# Altium PCB AlarmClock.PcbDoc
Units mil, origin at the board's own origin, x right, y up, seen from the top; angles counter-clockwise.
Board outline 5720 x 4170 mil, 4 copper layers (Top Layer, GND, +3V3, Bottom Layer), stack 23.756 mil thick; 55 components, 37 nets, 213 pads, 30 vias.
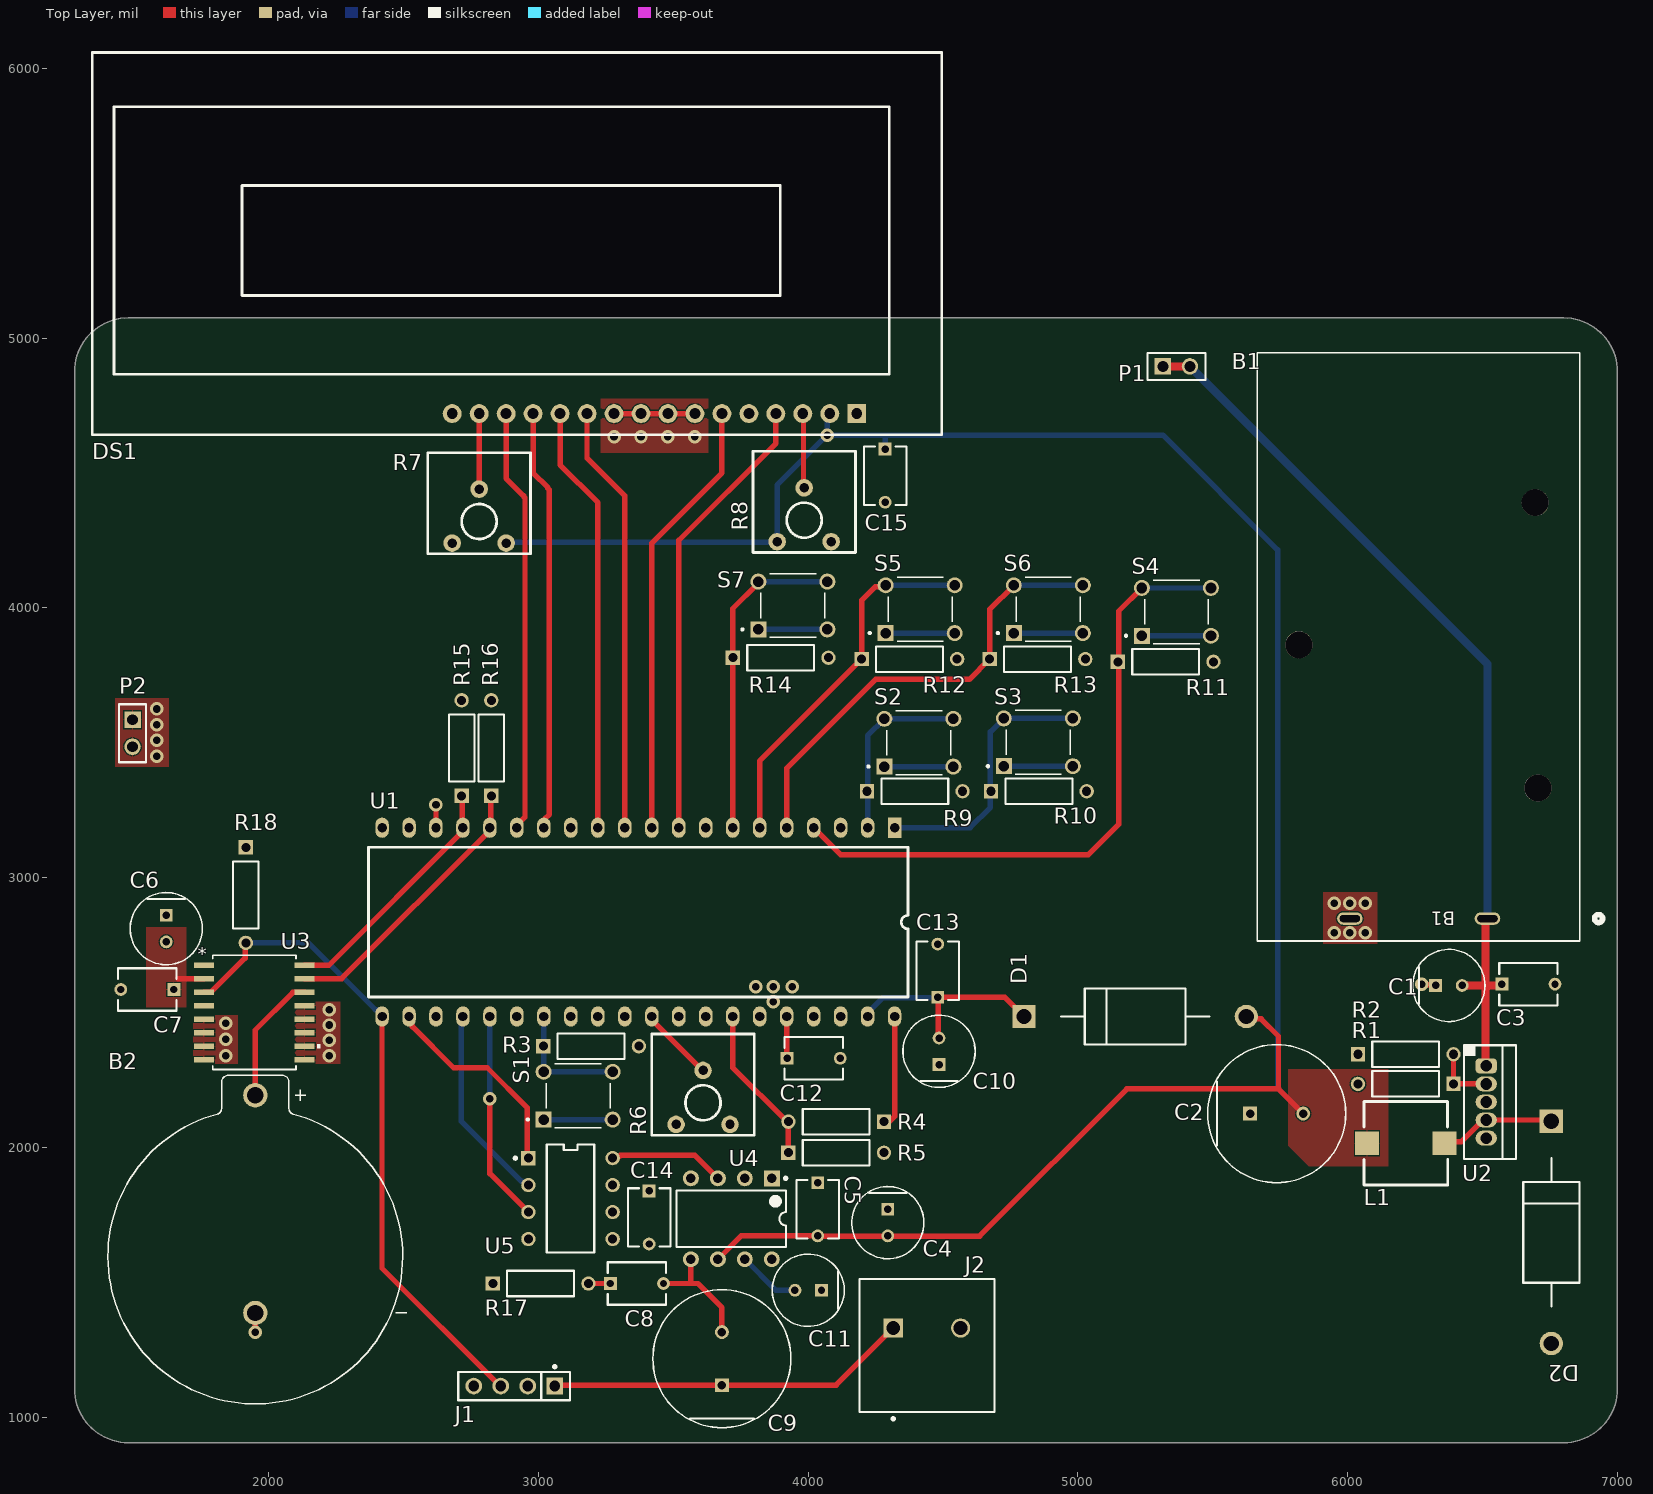
[diagram p0: Top Layer view]
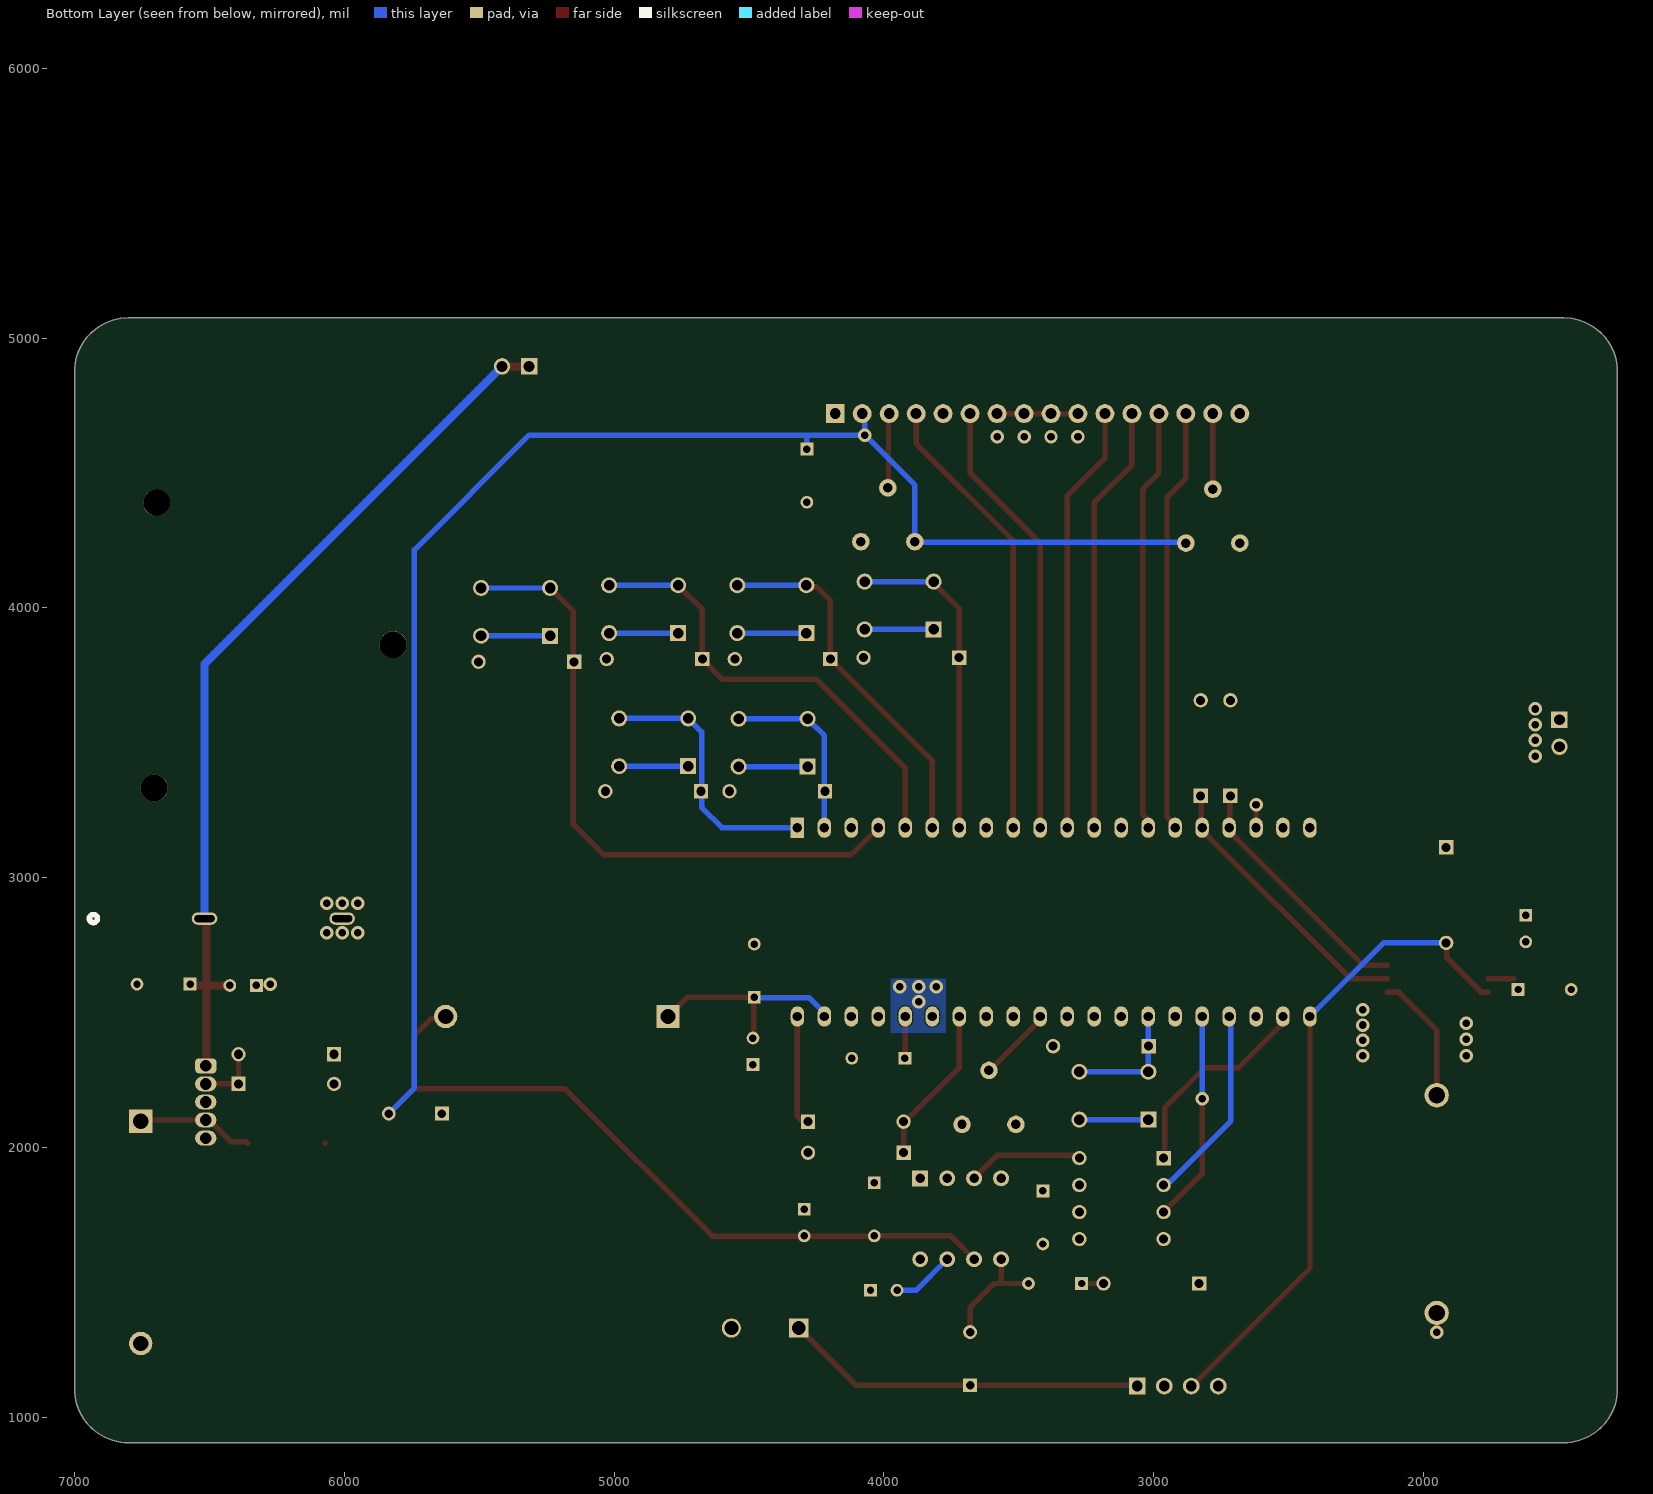
[diagram p1: Bottom Layer view, seen from below]
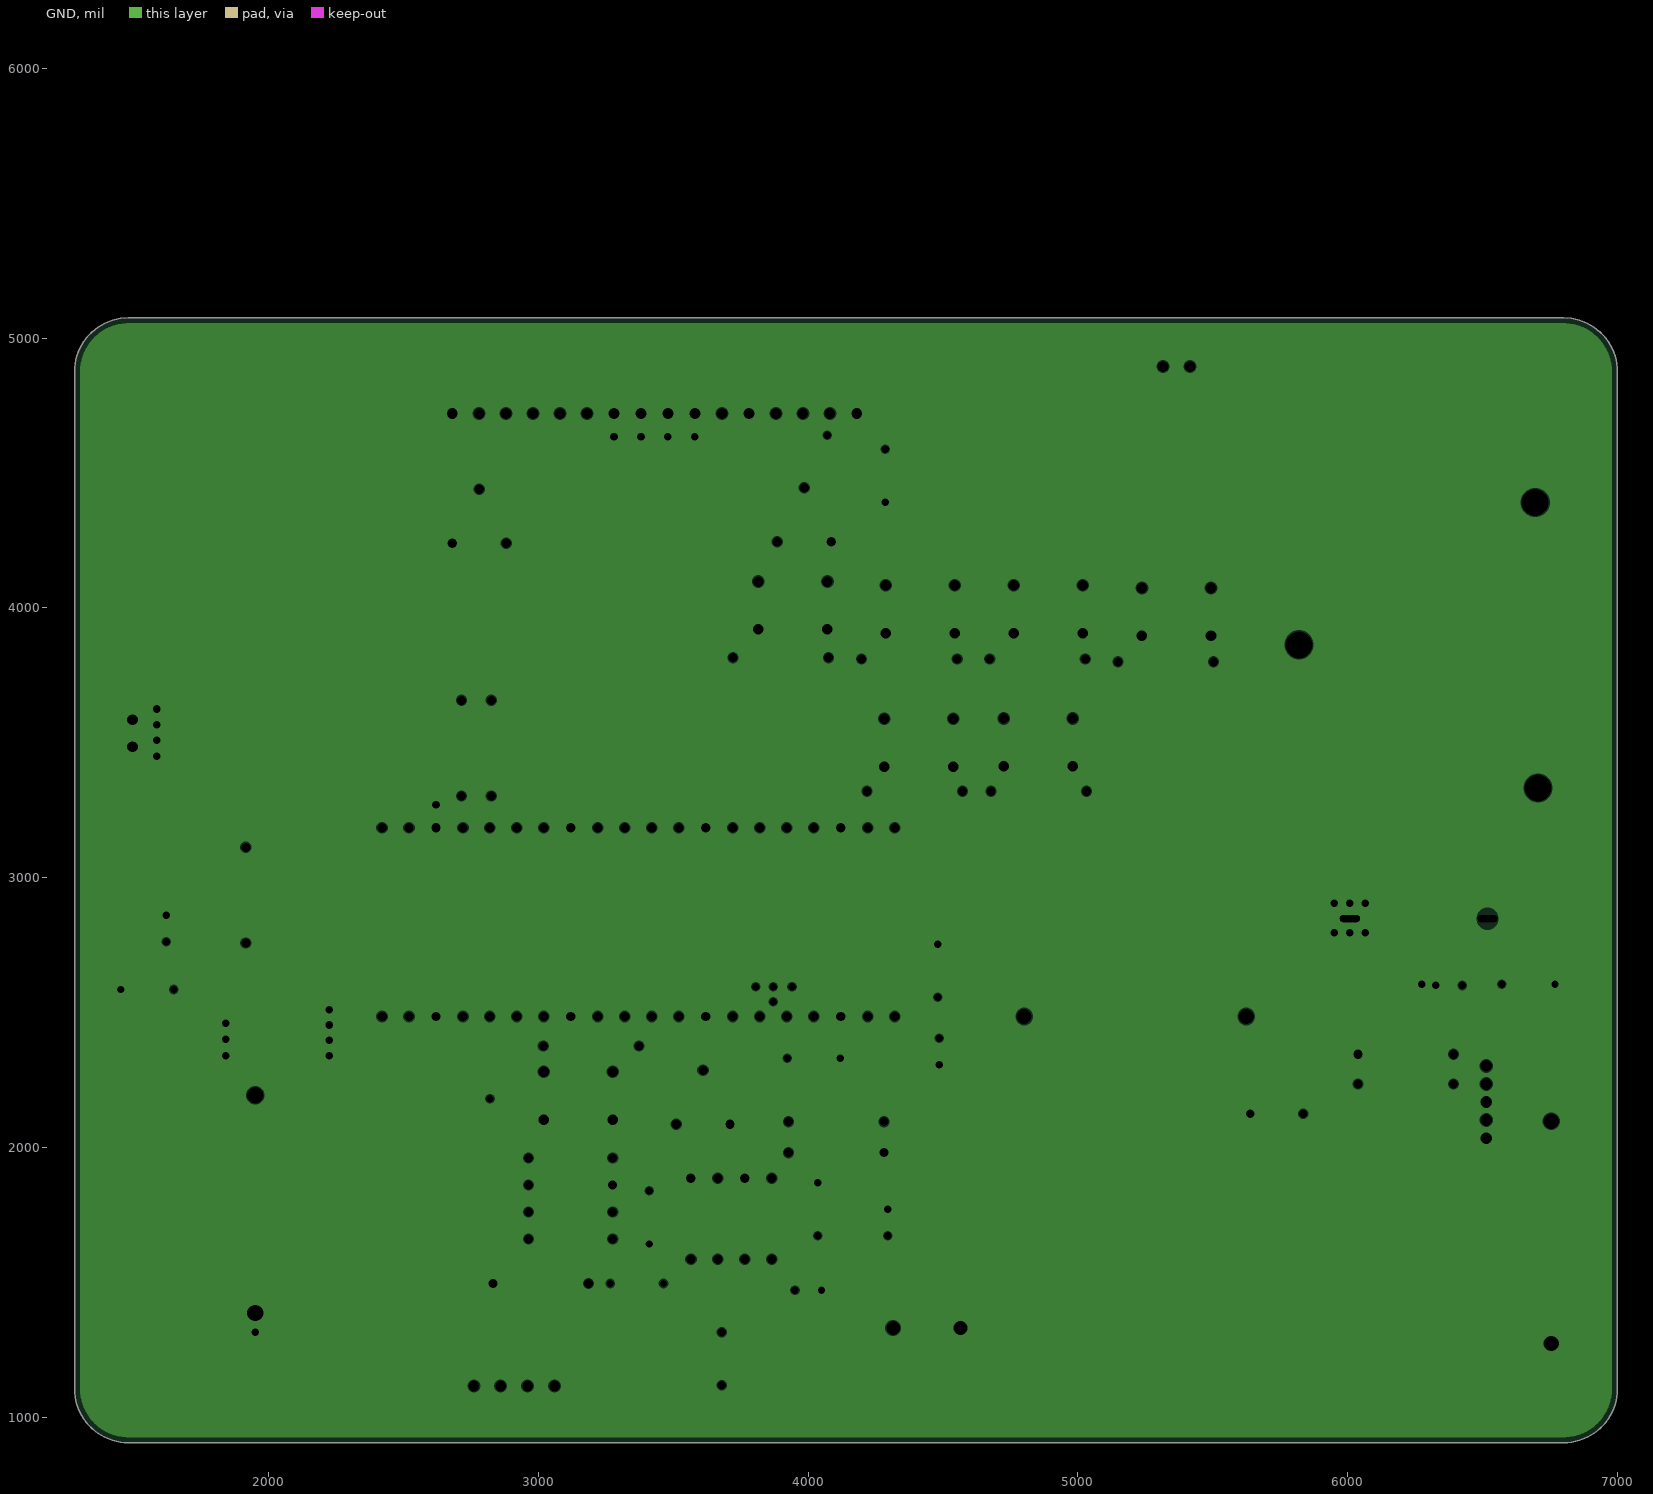
[diagram p2: GND, clearances drawn from the general rule]
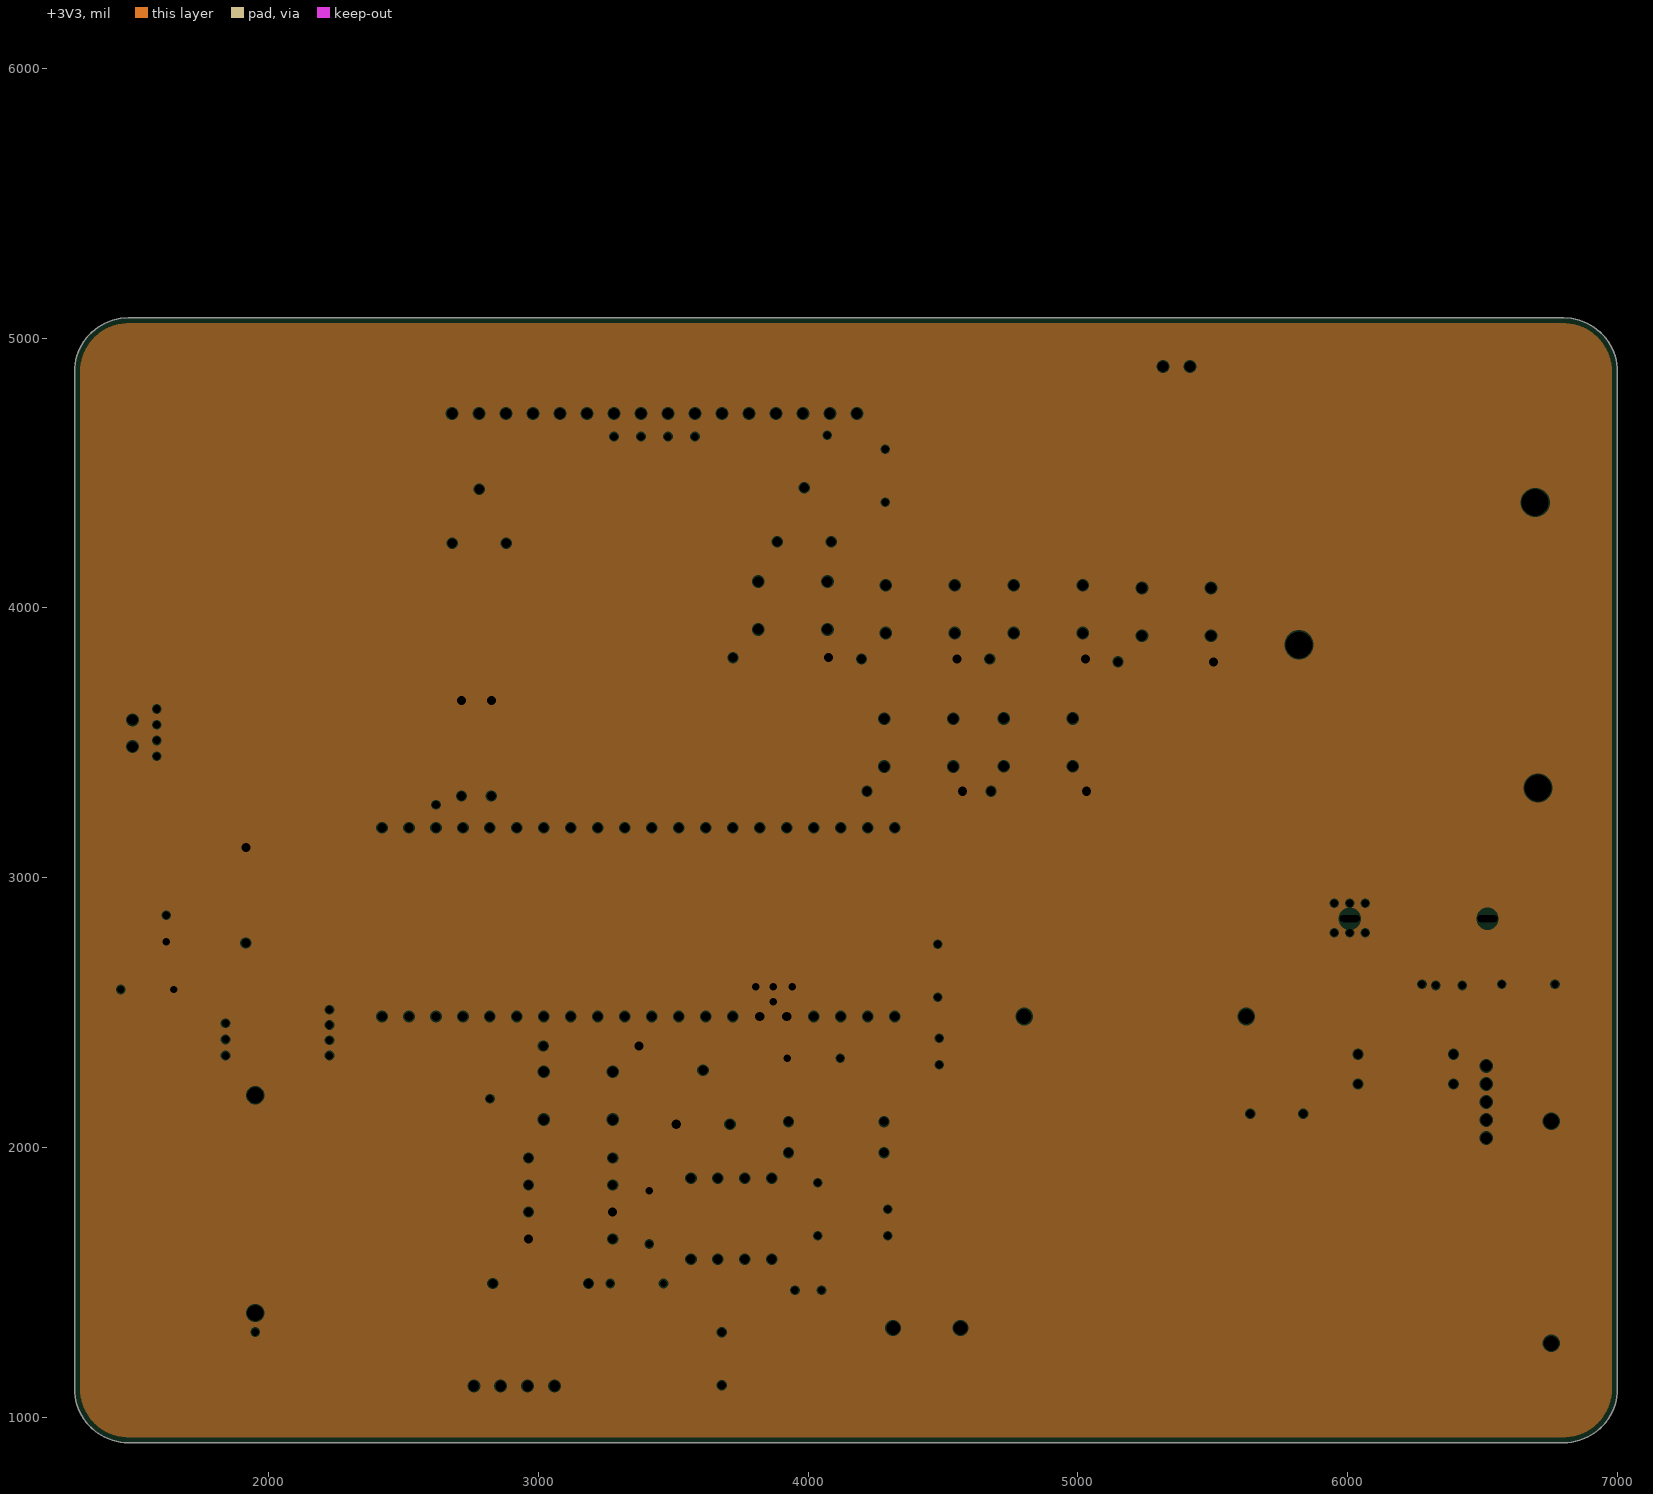
[diagram p3: +3V3, clearances drawn from the general rule]
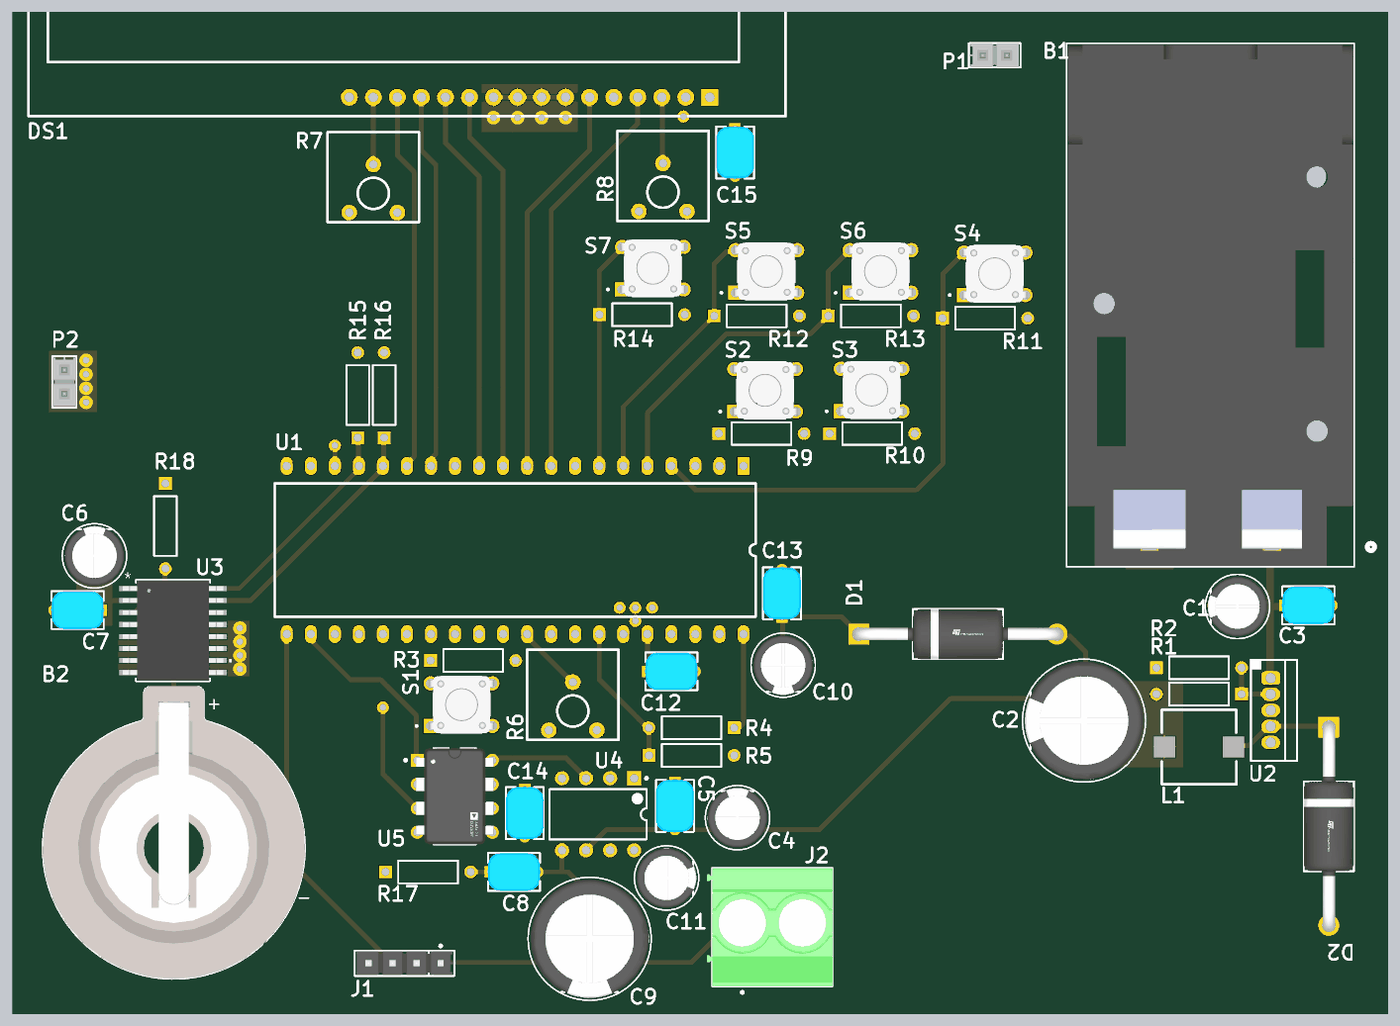
[diagram p4: 3D render of the assembled board from above, using the file's embedded part models]

## Layer stack, top to bottom
Top Solder: solder mask 0.4, Solder Resist, Dk 3.5
Top Layer: signal copper 1.4
Dielectric 2: prepreg 2.8, PP-006, Dk 4.1
GND: plane copper 1.378, net GND
Dielectric 1: dielectric 12.6, FR-4, Dk 4.8
+3V3: plane copper 1.378, net +3V3
Dielectric 3: prepreg 2.8, PP-006, Dk 4.1
Bottom Layer: signal copper 1.4
Bottom Solder: solder mask 0.4, Solder Resist, Dk 3.5

## Board outline
1280,1105 ccw(c1480,1105) 1480,905 6600,905 6800,905 ccw(c6800,1105) 7000,1105 7000,4875 ccw(c6800,4875) 6800,5075 1480,5075 ccw(c1480,4875) 1280,4875

## Design rules (kind name [scope] priority, off if disabled: settings)
BoardOutlineClearance [All] p1: gap=19.68 ignorepadtopadclearanceinfootprint=FALSE
Clearance [All] p1: gap=4 ignorepadtopadclearanceinfootprint=FALSE except(5: Arc-Via Track-Via SMDPad-Via THPad-Via Via-Via Via-Fill Via-Poly Via-Region Via-Text; 9.84: Arc-Hole Track-Hole SMDPad-Hole THPad-Hole Via-Hole Fill-Hole Poly-Hole Region-Hole Text-Hole)
ComponentClearance [All] p1: gap=4 collisioncheckmode=3 verticalgap=4 showdistances=TRUE
DiffPairsRouting [All] p1: maxlimit=4 minlimit=4 mostfreqgap=4 toplayer_minwidth=4 toplayer_maxwidth=71497.94 toplayer_prefwidth=4 bottomlayer_minwidth=4 bottomlayer_maxwidth=71497.94 bottomlayer_prefwidth=4 maxuncoupledlength=500
Height [All] p1: minheight=0 maxheight=71497.94 prefheight=500
HoleSize [All] p1: absolutevalues=TRUE maxlimit=248.03 minlimit=7.87 maxpercent=80.000 minpercent=20.000
HoleToHoleClearance [All] p1: gap=9.84 allowstackedmicrovias=FALSE
MinimumAnnularRing [All] p1: minimumring=3
MinimumSolderMaskSliver [All] p1: minsoldermaskwidth=0
PlaneClearance [All] p1: clearance=4
PlaneConnect PlaneConnectPowerPads [InPadClass('PowerPads')] p1: planeconnectstyle=Direct reliefexpansion=20 reliefentries=4 reliefconductorwidth=10 reliefairgap=10
PlaneConnect [All] p2: pad.planeconnectstyle=Relief pad.reliefexpansion=11.81 pad.reliefentries=4 pad.reliefconductorwidth=4 pad.reliefairgap=4 via.planeconnectstyle=Direct via.reliefexpansion=11.81 via.reliefentries=4 via.reliefconductorwidth=5 via.reliefairgap=5
PolygonConnect PolygonConnectPowerPads [All vs (InPadClass('PowerPads'))] p1: connectstyle=Direct reliefconductorwidth=10 reliefentries=4 polygonreliefangle="90 Angle" airgapwidth=10
PolygonConnect [All] p2: thpad.connectstyle=Relief thpad.reliefconductorwidth=4 thpad.reliefentries=4 thpad.polygonreliefangle="90 Angle" thpad.airgapwidth=4 smdpad.connectstyle=Relief smdpad.reliefconductorwidth=4 smdpad.reliefentries=4 smdpad.polygonreliefangle="90 Angle" smdpad.airgapwidth=4 via.connectstyle=Direct via.reliefconductorwidth=5 via.reliefentries=4 via.polygonreliefangle="90 Angle" via.airgapwidth=5
RoutingVias [All] p1: holewidth=20 width=40 viastyle="Through Hole" minholewidth=20 minwidth=40 maxholewidth=20 maxwidth=40
SilkToSilkClearance [All] p1: silktosilkclearance=0
SilkToSolderMaskClearance [IsPad] p1: minsilkscreentomaskgap=4 clearancetoexposedcopper=TRUE
SolderMaskExpansion [All] p1: expansion=2.95 istentingtop=FALSE
SupplyNets "Schematic Supply Nets_2" [InNet('+3V3')] p1: voltage=0.000
SupplyNets "Schematic Supply Nets_1" [InNet('+5V')] p2: voltage=0.000
SupplyNets "Schematic Supply Nets" [InNet('GND')] p3: voltage=0.000
Width +9V [InNet('+9V')] p1: maxlimit=30 minlimit=30 preferedwidth=30 minimp=50.000000 maximp=50.000000 favimp=50.000000
Width "Regulated Power" [InNetClass('Regulated Power')] p2: maxlimit=24 minlimit=15 preferedwidth=20 minimp=50.000000 maximp=50.000000 favimp=50.000000
Width Communications [InNetClass('Communications')] p3: maxlimit=12 minlimit=8 preferedwidth=10 minimp=50.000000 maximp=50.000000 favimp=50.000000
Width GND [All] p4: maxlimit=35 minlimit=15 preferedwidth=20 minimp=50.000000 maximp=50.000000 favimp=50.000000
Width [All] p5: maxlimit=40 minlimit=6 preferedwidth=10 minimp=50.000000 maximp=50.000000 favimp=50.000000
20 further rules are at their usual default settings.

## Classes and differential pairs
component class Peripherals: B2 C4 C5 C6 C7 C8 C9 C11 C14 C15 DS1 J2 R15 R16 R17 R18 U3 U4 U5
component class Core: B1 C1 C2 C3 C10 C12 C13 D1 D2 J1 L1 P1 P2 R1 R2 U1 U2
component class "Control & Inputs": R3 R4 R5 R6 R7 R8 R9 R10 R11 R12 R13 R14 S1 S2 S3 S4 S5 S6 S7

## Components (designator, comment, footprint, x,y, rotation, side; value= is the part's Value field where it differs from the comment)
B1 "BC9VPC" BC9VPC_MPD 6518,2848 r180 top
B2 "106" BAT_106 1950,1595 r180 top
C1 "EEUFM1E101B" FP-RAD-TH-D_6_3_0_5-L_11-MFG 6375,2600 r0 top
C2 "EEUFP1V102B" FP-RAD-TH-D_12_5_0_5-L_20-MFG 5736.57,2125 r0 top value=1000uF
C3 "RDED72W104K3K1H03B" FP-RDE3M1-MFG 6670,2605 r0 top
C4 "EEUFM1E101B" FP-RAD-TH-D_6_3_0_5-L_11-MFG 4295,1720.79 r270 top
C5 "RDED72W104K3K1H03B" FP-RDE3M1-MFG 4035,1770 r270 top
C6 "EEUFM1E101B" FP-RAD-TH-D_6_3_0_5-L_11-MFG 1620,2810.79 r270 top
C7 "RDED72W104K3K1H03B" FP-RDE3M1-MFG 1550,2585 r180 top
C8 "RDED72W104K3K1H03B" FP-RDE3M1-MFG 3365,1495 r0 top
C9 "EEUFS1K271B" FP-RAD-TH-D_12_5_0_5-L_20-MFG 3680,1216.57 r90 top
C10 "EEUFM1E101B" FP-RAD-TH-D_6_3_0_5-L_11-MFG 4485,2355.79 r90 top
C11 "EEUFM1E101B" FP-RAD-TH-D_6_3_0_5-L_11-MFG 4000,1470 r180 top
C12 "RDED72W104K3K1H03B" FP-RDE3M1-MFG 4020,2330 r0 top
C13 "RDED72W104K3K1H03B" FP-RDE3M1-MFG 4480,2655 r90 top
C14 "RDED72W104K3K1H03B" FP-RDE3M1-MFG 3410,1740 r270 top
C15 "RDED72W104K3K1H03B" FP-RDE3M1-MFG 4285,4490 r270 top
D1 "1N5822" FP-DO-201AD-MFG 5212.2,2485 r0 top
D2 "1N5822" FP-DO-201AD-MFG 6755,1685 r270 top
DS1 "LCD 44780" "OLED 16x2" 4180,4720 r180 top
J1 "TSW-104-23-T-S" FP-TSW-104-23-T-S-MFG 2910,1115 r180 top
J2 "1714955" PHOE-1714955_V 4440,1330 r0 top
L1 "Inductor" SPD73R-334M 6215,2015 r180 top value=330uH
P1 "TSW-102-26-T-S" SMTC-TSW-102-26-XX-S 5315,4895 r0 top
P2 "TSW-102-26-T-S" SMTC-TSW-102-26-XX-S 1495,3585 r270 top
R1 "MFR-25FBF52-1M" RESA60-630X240 6215,2235 r180 top
R2 "MFR-25FBF52-1M" RESA60-630X240 6215,2345 r0 top
R3 "MFR-25FBF52-1M" RESA60-630X240 3195,2375 r0 top
R4 "MFR-25FBF52-1M" RESA60-630X240 4103.66,2095 r180 top
R5 "MFR-25FBF52-1M" RESA60-630X240 4103.66,1980 r0 top
R6 "RPot_3" "POT OFFSET 200" 3510,2085 r0 top value=10K
R7 "RPot_3" "POT OFFSET 200" 2680,4240 r0 top value=10K
R8 "RPot_3" "POT OFFSET 200" 3885,4245 r0 top value=10K
R9 "MFR-25FBF52-1M" RESA60-630X240 4395,3320 r0 top
R10 "MFR-25FBF52-1M" RESA60-630X240 4855,3320 r0 top
R11 "MFR-25FBF52-1M" RESA60-630X240 5325,3800 r0 top
R12 "MFR-25FBF52-1M" RESA60-630X240 4375,3810 r0 top
R13 "MFR-25FBF52-1M" RESA60-630X240 4850,3810 r0 top
R14 "MFR-25FBF52-1M" RESA60-630X240 3897.83,3815 r0 top
R15 "MFR-25FBF52-1M" RESA60-630X240 2715,3480 r90 top
R16 "MFR-25FBF52-1M" RESA60-630X240 2825,3480 r90 top
R17 "MFR-25FBF52-1M" RESA60-630X240 3007.83,1495 r0 top
R18 "MFR-25FBF52-1M" RESA60-630X240 1915,2935 r270 top
S1 "TL1105AF160Q" SW_TL1105AF160Q 3147.05,2191.42 r0 top
S2 "TL1105AF160Q" SW_TL1105AF160Q 4410,3500 r0 top
S3 "TL1105AF160Q" SW_TL1105AF160Q 4852.95,3501.42 r0 top
S4 "TL1105AF160Q" SW_TL1105AF160Q 5365,3985 r0 top
S5 "TL1105AF160Q" SW_TL1105AF160Q 4415,3995 r0 top
S6 "TL1105AF160Q" SW_TL1105AF160Q 4890,3995 r0 top
S7 "TL1105AF160Q" SW_TL1105AF160Q 3942.95,4008.58 r0 top
U1 "Raspberry Pi Pico" "Raspberry Pi Pico" 4320,3185 r270 top
U2 "LM2576T-ADJ/NOPB" KC0005A 6513.5,2168 r0 top
U3 "DS3231SN#T&R" 21-0042B_16_MXM 1946.5,2500 r0 top
U4 "LM386N-1" DIP-8 3715,1735 r270 top
U5 "LTC1661IN8#PBF" FP-N-8-05-08-1510-MFG 3118.75,1810 r0 top

## Footprints (in the part's own frame and the unit in brackets; to place one, negate y for a bottom-side part, rotate by r counter-clockwise, add the part's x,y. Pads: shape width x height; smd on the part's side, far side on the other; paste and mask are expansions set on the pad)
21-0042B_16_MXM [mil]
  rect 74x21 smd paste+0 mask+0: 1(-186.5,175) 2(-186.5,125) 3(-186.5,75) 4(-186.5,25) 5(-186.5,-25) 6(-186.5,-75) 7(-186.5,-125) 8(-186.5,-175) 9(186.5,-175) 10(186.5,-125) 11(186.5,-75) 12(186.5,-25) 13(186.5,25) 14(186.5,75) 15(186.5,125) 16(186.5,175)
  silkscreen extent -154,-212 244,212, body extent -209,-206 209,206, height 104
BAT_106 [mm]
  round 2.28 hole 1.52: N(0,5.311) P(0,-15.189)
  silkscreen extent -14.25,-17.06 13.88,13.88, body extent -13.88,-17.08 13.88,13.88, height 5.97
BC9VPC_MPD [mil]
  oval 95x46 hole 26 slot 75 at 0 deg paste-99999 mask+0: 1(0,0) 2(510,0)
  round 100 hole 100 unplated paste-99999 mask+0: 3(-187,-484) 4(699,-1015) 5(-177,-1542)
  silkscreen extent -427,-2097 854,83, body extent -338,-2090 848,80, height 845
DIP-8 [mm]
  rect 1.5x1.5 hole 0.9: 1(-3.81,3.81)
  round 1.5 hole 0.9: 2(-3.81,1.27) 3(-3.81,-1.27) 4(-3.81,-3.81) 5(3.81,-3.81) 6(3.81,-1.27) 7(3.81,1.27) 8(3.81,3.81)
  silkscreen extent -3.93,-5.15 2.65,5.24, body extent -3.6,-5.15 3.6,5.15, height 5.08
FP-DO-201AD-MFG [mm]
  rect 2.2x2.2 hole 1.45 paste-2539.97 mask+0: 1(-10.47,0)
  round 2.2 hole 1.45 paste-2539.97 mask+0: 2(10.47,0)
  silkscreen extent -7,-2.65 7,2.65, body extent -11.67,-2.75 11.67,2.75, height 0.25
FP-N-8-05-08-1510-MFG [mm]
  rect 1.35x1.35 hole 0.85 paste-2539.97 mask+0: 1(-3.969,3.81)
  round 1.35 hole 0.85 paste-2539.97 mask+0: 2(-3.969,1.27) 3(-3.969,-1.27) 4(-3.969,-3.81) 5(3.969,-3.81) 6(3.969,-1.27) 7(3.969,1.27) 8(3.969,3.81)
  silkscreen extent -5.32,-5.08 2.24,5.08, body extent -4.74,-5.31 4.74,5.31, height 0.25
FP-RAD-TH-D_6_3_0_5-L_11-MFG [mm]
  rect 1.2x1.2 hole 0.7 paste-2539.97 mask+0: 1(-1.25,0)
  round 1.2 hole 0.7 paste-2539.97 mask+0: 2(1.25,0)
  silkscreen extent -3.4,-3.4 3.4,3.4, body extent -3.5,-3.5 3.5,3.5, height 0.25
FP-RAD-TH-D_12_5_0_5-L_20-MFG [mm]
  rect 1.3x1.3 hole 0.8 paste-2539.97 mask+0: 1(-2.5,0)
  round 1.3 hole 0.8 paste-2539.97 mask+0: 2(2.5,0)
  silkscreen extent -6.5,-6.5 6.5,6.5, body extent -6.6,-6.6 6.6,6.6, height 0.25
FP-RDE3M1-MFG [mm]
  rect 1.2x1.2 hole 0.7 paste-2539.97 mask+0: 1(-2.5,0)
  round 1.2 hole 0.7 paste-2539.97 mask+0: 2(2.5,0)
  silkscreen extent -2.75,-2 2.75,2, body extent -3.2,-2.1 3.2,2.1, height 0.25
FP-TSW-104-23-T-S-MFG [mm]
  rect 1.57x1.57 hole 1.02 paste-2539.97 mask+0: 1(-3.81,0)
  round 1.57 hole 1.02 paste-2539.97 mask+0: 2(-1.27,0) 3(1.27,0) 4(3.81,0)
  silkscreen extent -5.27,-1.95 5.27,1.34, body extent -5.37,-1.44 5.37,1.44, height 0.25
KC0005A [mm] "FM, 5-Leads, Body 10.16x8.46mm, Pitch 1.7mm"
  rrect50% 2x1.4 hole 1.1: 1(0,3.4)
  oval 2x1.4 hole 1.1: 2(0,1.7) 3(0,0) 4(0,-1.7) 5(0,-3.4)
  silkscreen extent -2.13,-5.35 2.8,5.35, body extent -2.08,-5.35 2.77,5.35, height 16.51
"OLED 16x2" [mil]
  rect 70x70 hole 40: 1(0,0)
  round 70 hole 40: 2(100,0) 3(200,0) 4(300,0) 5(400,0) 6(500,0) 7(600,0) 8(700,0) 9(800,0) 10(900,0) 11(1000,0) 12(1100,0) 13(1200,0) 14(1300,0) 15(1400,0) 16(1500,0)
  silkscreen extent -315,-1339 2835,79, body extent -320,-1345 2840,85, height 85
PHOE-1714955_V [mm] "Terminal Block, 2-Leads, Body 12.7x12.5mm, Pitch 6.35mm"
  rect 1.8x1.8 hole 1.3: 1(-3.175,0)
  round 1.8 hole 1.3: 2(3.175,0)
  silkscreen extent -6.35,-8.67 6.35,4.6, body extent -6.92,-7.9 6.35,4.6, height 21.51
"POT OFFSET 200" [mil]
  round 65 hole 35: 1(0,0) 2(100,200) 3(200,0)
  silkscreen extent -90,-40 290,335
"Raspberry Pi Pico" [mil]
  rect 75x50 hole 35: 1(0,0)
  oval 75x50 hole 35: 2(0,-100) 3(0,-200) 4(0,-300) 5(0,-400) 6(0,-500) 7(0,-600) 8(0,-700) 9(0,-800) 10(0,-900) 11(0,-1000) 12(0,-1100) 13(0,-1200) 14(0,-1300) 15(0,-1400) 16(0,-1500) 17(0,-1600) 18(0,-1700) 19(0,-1800) 20(0,-1900) 21(700,-1900) 22(700,-1800) 23(700,-1700) 24(700,-1600) 25(700,-1500) 26(700,-1400) 27(700,-1300) 28(700,-1200) 29(700,-1100) 30(700,-1000) 31(700,-900) 32(700,-800) 33(700,-700) 34(700,-600) 35(700,-500) 36(700,-400) 37(700,-300) 38(700,-200) 39(700,-100) 40(700,0)
  silkscreen extent 72,-1950 628,50
RESA60-630X240 [mm] "Axial Resistor, 2-Leads, Dia 2.4mm, Body Length 6.3mm"
  rect 1.35x1.35 hole 0.85: 1(-4.5,0)
  round 1.35 hole 0.85: 2(4.5,0)
  silkscreen extent -3.15,-1.2 3.15,1.2, body extent -3.15,-1.2 3.15,1.2, height 2.4
SMTC-TSW-102-26-XX-S [mm] ".025 SQ Post Terminal Strip Assembly, 1x2 Pins, Vertical, 2.54mm Pitch, Male"
  rect 1.55x1.55 hole 1.02: 1(0,0)
  round 1.55 hole 1.02: 2(2.54,0)
  silkscreen extent -1.46,-1.27 4,1.27, body extent -1.4,-1.27 3.81,1.27, height 8.38
SPD73R-334M [mil]
  rect 88x88 smd: 1(-143.5,0) 2(143.5,0)
  silkscreen extent -156,-155 155,155
SW_TL1105AF160Q [mm]
  rect 1.508x1.508 / inner round 1.508 / far side rect 1.508x1.508 hole 1 mask+0.102: 1(-3.25,-2.25)
  round 1.508 hole 1 mask+0.102: 2(3.25,-2.25) 3(-3.25,2.25) 4(3.25,2.25)
  silkscreen extent -4.85,-3 3,3, body extent -3.94,-3 3.94,3, height 3.21

## Part data
B1: "Description", Manufacturer_Name="Memory Protection Devices", Copyright="Copyright (C) 2026 Ultra Librarian. All rights reserved.", Manufacturer_Part_Number=BC9VPC
B2: "Battery Holder, Heavy Duty, THM, Plastic, 1 Cell, 20mm", Package=None, Check_prices=https://www.snapeda.com/parts/106/Keystone/view-part/?ref=eda, MF="Keystone Electronics", MP=106, SnapEDA_Link=https://www.snapeda.com/parts/106/Keystone/view-part/?ref=snap
C1 C4 C10: library part CMP-05427-000856-1, "Aluminum Electrolytic Capacitors (Radial Lead Type) 100uF ±20% 25V", Capacitance=100uF, Case/Package=Radial, ESR (Equivalent Series Resistance)=130mR, Max Operating Temperature=105°C, Min Operating Temperature=-40°C, Package Quantity=2000, Ripple Current=455mA, Tolerance=20%, Voltage Rating=25V, Diameter=6mm, Height - Seated (Max)=0.5inch, Impedance=130mR, Lead Diameter=0.5mm, Lead Pitch=5mm, Length=11mm, Life (Hours)=2000Hour, Mount="Through Hole", Packaging="Tape and Reel", Polarity=Polar, RoHS Compliant=Yes, Series=FM, Termination=Radial, Voltage Rating (DC)=25V
C2: library part CMP-05427-001378-1, "Aluminum Electrolytic Capacitors (Radial Lead Type) AEC-Q200 Qualified 1000uF ±20% 35V", RoHS Compliant=Yes
C3 C5 C7 C12 C13 C14 C15: library part CMP-06035-016817-1, "Ceramic Capacitor 100nF ±10% 450V X7T Radial", Capacitance=100nF, Case/Package=Radial, Dielectric=X7T, Max Operating Temperature=125°C, Min Operating Temperature=-55°C, Tolerance=10%, Voltage Rating=450V, Lead Pitch=5mm, REACH SVHC="No SVHC", Voltage Rating (DC)=450V
C6: library part CMP-05427-000856-1, "Aluminum Electrolytic Capacitors (Radial Lead Type) 100uF ±20% 25V", Capacitance=1uF, Case/Package=Radial, ESR (Equivalent Series Resistance)=130mR, Max Operating Temperature=105°C, Min Operating Temperature=-40°C, Package Quantity=2000, Ripple Current=455mA, Tolerance=20%, Voltage Rating=25V, Diameter=6mm, Height - Seated (Max)=0.5inch, Impedance=130mR, Lead Diameter=0.5mm, Lead Pitch=5mm, Length=11mm, Life (Hours)=2000Hour, Mount="Through Hole", Packaging="Tape and Reel", Polarity=Polar, RoHS Compliant=Yes, Series=FM, Termination=Radial, Voltage Rating (DC)=25V
C8: library part CMP-06035-016817-1, "Ceramic Capacitor 100nF ±10% 450V X7T Radial", Capacitance=50nF, Case/Package=Radial, Dielectric=X7T, Max Operating Temperature=125°C, Min Operating Temperature=-55°C, Tolerance=10%, Voltage Rating=450V, Lead Pitch=5mm, REACH SVHC="No SVHC", Voltage Rating (DC)=450V
C9: library part CMP-05427-000433-1, "Aluminum Electrolytic Capacitors (Radial Lead Type) 270uF ±20% 80V", Capacitor=270uF, RoHS Compliant=Yes
C11: library part CMP-05427-000856-1, "Aluminum Electrolytic Capacitors (Radial Lead Type) 100uF ±20% 25V", Capacitance="OPT. BYP.", Case/Package=Radial, ESR (Equivalent Series Resistance)=130mR, Max Operating Temperature=105°C, Min Operating Temperature=-40°C, Package Quantity=2000, Ripple Current=455mA, Tolerance=20%, Voltage Rating=25V, Diameter=6mm, Height - Seated (Max)=0.5inch, Impedance=130mR, Lead Diameter=0.5mm, Lead Pitch=5mm, Length=11mm, Life (Hours)=2000Hour, Mount="Through Hole", Packaging="Tape and Reel", Polarity=Polar, RoHS Compliant=Yes, Series=FM, Termination=Radial, Voltage Rating (DC)=25V
D1 D2: library part CMP-12187-000025-1, "DIODE SCHOTTKY 40V 3A DO201AD", Forward Current=3A, Manufacturer=STMicroelectronics, Max Junction Temp=+150°C, Max Repetitive Reverse Voltage=40V, Max Surge Forward Current=80A, Package=DO-201AD, Peak Reverse Current=2mA, Temperature="to +150°C", Automotive=No, Category=Diode, ComponentLink2Description=Datasheet, ComponentLink2URL=https://www.st.com/resource/en/datasheet/1n5822.pdf, Device Class L1="Discrete Semiconductors", Device Class L2=Diodes, Device Class L3="Schottky Diodes", Digikey Description="DIODE SCHOTTKY 40V 3A DO201AD", Height=5.3mm, Lead Free=Yes, Manufacturer Part Number=1N5822, Mouser Description="Schottky Diodes & Rectifiers Vr/40V Io/3A BULK", Octopart=https://octopart.com/1n5822-stmicroelectronics-323225, RoHS=TRUE, Temperature Range High=+150°C
J1: library part CMP-02766-001388-1, "CONN HEADER VERT 4POS 2.54MM", Color=Black, Max Current Rating=7.6A, Max Operating Temperature=105°C, Max Voltage Rating (AC)=550V, Min Operating Temperature=-55°C, Package Quantity=1, Connector Type="Male Pin", Contact Material=Bronze, Contact Mating Length=0.23inch, Contact Plating=Tin, Contact Type="Male Pin", Depth=2.54mm, Gender=Male, Housing Color=Black, Housing Material=Polyester, Lead Free="Lead Free", Length=10.16mm, Mount="Through Hole", Number of Contacts=4, Number of Positions=4, Number of Rows=1, Orientation=Straight, Packaging=Bulk, Pitch=2.54mm, Radiation Hardening=No, REACH SVHC="No SVHC", RoHS Compliant=Yes, Series=TSW, Termination=Solder, Width=2.54mm
J2: library part CMP-2000-05797-1, "PC Terminal Block, Pitch 6.35 mm, 1 x 2 Position, Height 21.5 mm, Tail Lenght 5.1 mm, RoHS, Bulk", Manufacturer="Phoenix Contact", Package Description="PC Terminal Block, Pitch 6.35 mm, 1 x 2 Position, Height 21.5 mm, Tail Lenght 5.1 mm", Datasheet URL=http://media.digikey.com/pdf/Data%20Sheets/Phoenix%20Contact%20PDFs/1714955.pdf, Datasheet Version=02/2010, Manufacturer URL=http://www.phoenixcontact.com/, Mounting Technology=ThroughHole, Package Reference=1714955
P1 P2: library part CMP-1024-00328-1, "0.025\" SQ Post Header, Through-hole, Vertical, -55 to 105 degC, 2.54 mm Pitch, 2-Pin, Male, RoHS", Manufacturer=Samtec, Temperature Range="-55 to 105 degC", ComponentLink1Description="Manufacturer URL", ComponentLink1URL=http://www.samtec.com, ComponentLink2Description=Datasheet, ComponentLink2URL=http://www.samtec.com/documents/webfiles/pdf/TSW_TH.PDF, ComponentLink3Description="Package Specification", ComponentLink3URL=http://www.samtec.com/documents/webfiles/cpdf/TSW-XXX-XX-XXX-X-XX-XXX-MKT.pdf, DatasheetVersion=F-214, Mounting Technology=Through-hole, Orientation=Vertical, PackageDescription=".025[0.64] SQ. Post Terminal Strip Assembly", PackageReference=TSW-102-26-XX-S, PackageVersion="DM, 8/1988", PartNumber=TSW-102-26-T-S, Pitch="2.54 mm", RoHS=True
R1: library part CMP-1659-00070-1, "Axial Resistor, 1 MOhm, +/- 1%, 250 mW, -55 to 155 degC, 2-Pin THD, RoHS, Bulk", Case\Package=Axial, Max Operating Temperature="155 degC", Min Operating Temperature="-55 degC", Package Quantity=200, Power Rating="250 mW", Resistance=6.8k, Tolerance=1%, Voltage Rating="250 V", ComponentLink1Description="Manufacturer URL", ComponentLink1URL=http://www.yageo.com/, ComponentLink2Description=Datasheet, ComponentLink2URL=http://www.yageo.com/documents/recent/Yageo%20LR_MFR_2013.pdf, DatasheetVersion=Apr-13, Length="0.248 inch", Mount="Through Hole", PackageDescription="2-Pin Axial Lead, Dia 2.4 mm, Body Length 6.3 mm", PackageReference=MFR-25, Packaging=Bulk, RoHSCompliant=true
R2 R3 R9 R10 R11 R12 R13 R14 R15 R16: library part CMP-1659-00070-1, "Axial Resistor, 1 MOhm, +/- 1%, 250 mW, -55 to 155 degC, 2-Pin THD, RoHS, Bulk", Case\Package=Axial, Max Operating Temperature="155 degC", Min Operating Temperature="-55 degC", Package Quantity=200, Power Rating="250 mW", Resistance=2.2k, Tolerance=1%, Voltage Rating="250 V", ComponentLink1Description="Manufacturer URL", ComponentLink1URL=http://www.yageo.com/, ComponentLink2Description=Datasheet, ComponentLink2URL=http://www.yageo.com/documents/recent/Yageo%20LR_MFR_2013.pdf, DatasheetVersion=Apr-13, Length="0.248 inch", Mount="Through Hole", PackageDescription="2-Pin Axial Lead, Dia 2.4 mm, Body Length 6.3 mm", PackageReference=MFR-25, Packaging=Bulk, RoHSCompliant=true
R4 R5 R18: library part CMP-1659-00070-1, "Axial Resistor, 1 MOhm, +/- 1%, 250 mW, -55 to 155 degC, 2-Pin THD, RoHS, Bulk", Case\Package=Axial, Max Operating Temperature="155 degC", Min Operating Temperature="-55 degC", Package Quantity=200, Power Rating="250 mW", Resistance=10k, Tolerance=1%, Voltage Rating="250 V", ComponentLink1Description="Manufacturer URL", ComponentLink1URL=http://www.yageo.com/, ComponentLink2Description=Datasheet, ComponentLink2URL=http://www.yageo.com/documents/recent/Yageo%20LR_MFR_2013.pdf, DatasheetVersion=Apr-13, Length="0.248 inch", Mount="Through Hole", PackageDescription="2-Pin Axial Lead, Dia 2.4 mm, Body Length 6.3 mm", PackageReference=MFR-25, Packaging=Bulk, RoHSCompliant=true
R6 R7 R8: library part RPot, "Potentiometer", LatestRevisionDate=17-Jul-2002, LatestRevisionNote="Re-released for DXP Platform.", Published=8-Jun-2000, Publisher="Altium Limited", Set Position=0.5, Sim Note="Enter the Resistance value and the set point into parameter fields."
R17: library part CMP-1659-00070-1, "Axial Resistor, 1 MOhm, +/- 1%, 250 mW, -55 to 155 degC, 2-Pin THD, RoHS, Bulk", Case\Package=Axial, Max Operating Temperature="155 degC", Min Operating Temperature="-55 degC", Package Quantity=200, Power Rating="250 mW", Resistance=10, Tolerance=1%, Voltage Rating="250 V", ComponentLink1Description="Manufacturer URL", ComponentLink1URL=http://www.yageo.com/, ComponentLink2Description=Datasheet, ComponentLink2URL=http://www.yageo.com/documents/recent/Yageo%20LR_MFR_2013.pdf, DatasheetVersion=Apr-13, Length="0.248 inch", Mount="Through Hole", PackageDescription="2-Pin Axial Lead, Dia 2.4 mm, Body Length 6.3 mm", PackageReference=MFR-25, Packaging=Bulk, RoHSCompliant=true
S1 S2 S3 S4 S5 S6 S7: "Tactile Switch SPST-NO Top Actuated Through Hole", Package=None, Check_prices=https://www.snapeda.com/parts/TL1105AF160Q/E-Switch/view-part/?ref=eda, MF=E-Switch, MP=TL1105AF160Q, SnapEDA_Link=https://www.snapeda.com/parts/TL1105AF160Q/E-Switch/view-part/?ref=snap
U2: library part CMP-0069-02005-3, "SIMPLE SWITCHER® 3A Step-Down Voltage Regulator, 5-pin TO-220, Pb-Free", Manufacturer="Texas Instruments", PackageTopMarking="NSUZXYTTE#*LM2576T*-ADJ P+", PowerWise=N, Code_JEDEC=TO-220-AB, ComponentLink1Description="Datasheet URL", ComponentLink1URL=http://www.ti.com/general/docs/lit/getliterature.tsp?genericPartNumber=LM2576&fileType=pdf, CompType=Switcher, PackageDescription="TO-220, Molded, 5 Lead, Straight", PackageReference=KC0005A, PinCount=5, RoHS=Y
U3: library part DS3231SNTR, "Extremely Accurate IÂ²C-Integrated RTC/TCXO/Crystal", Manufacturer_Name="Analog Devices Inc", Copyright="Copyright (C) 2025 Ultra Librarian. All rights reserved.", Manufacturer_Part_Number=DS3231SN#T&R, RefDes=RefDes, Type=Type
U4: "Low-Voltage Audio Power Amplifier", PackageDocument=Sep-1997, DatasheetDocument=Sep-1997, PackageReference=N08E, Published=15-Apr-2002, Publisher="Altium Limited"
U5: library part CMP-00026-88317689-1, "LTC1661IN8#PBF Dual Serial Input Loading 30 Us Settling Time 10-BIT Dac PDIP8", Case/Package=DIP, Manufacturer Lifecycle Status=PRODUCTION, Max Operating Temperature=85°C, Max Supply Voltage=5.5V, Min Operating Temperature=-40°C, Min Supply Voltage=2.7V, Integral Nonlinearity (INL)=2LSB, Interface=Serial, Lead Free="Lead Free", Lifecycle Status=Production, Mount="Through Hole", NexarPartId=88317689, Number of Bits=10, Number of Channels=2, Number of Converters=2, Number of Pins=8, Output Type=Voltage, Resolution=1.25B, RoHS=Compliant, Settling Time=30µs, Supply Type=Single
L1: Code_IEC=1005, Code_JEITA=0402, LatestRevisionDate=29-May-2009, LatestRevisionNote="IPC-7351 Footprint Added.", PackageDescription="Chip Inductor", PackageReference=0402-A, Published=8-Jun-2000, Publisher="Altium Limited"

## Via types
v1: diameter 50, hole 28, Top Layer to Bottom Layer, 30 vias

## Nets (pads, with @x,y where several pads share a name; then routed paths per layer and width w, separated by ;. In a path a pad name is that pad's centre, name@x,y a point inside that pad or via, vN(x,y) a via of type N, cw(c..) or ccw(c..) an arc to the next point about the centre after c; other vN are vias at no path point)
+3V3: C6.2 C7.1 C12.1 C14.1 R3.2 R6.1 R9.2 R10.2 R11.2 R12.2 R13.2 R14.2 R15.2 R16.2 R18.1 U1.35 U1.36 U3.2 U5.4 U5.6 | length 250.7
  Top Layer w20: 1665,2625 U3.2 ; U1.36 3920,2331.57 C12.1
  other v1: 3870,2540 3805,2595 3870,2595 3940,2595
+3V_BAT: B2.P U3.14 | length 483
  Top Layer w20: B2.P 1950,2435 2089.5,2574.5 2132.5,2574.5 U3.14
+5V: C2.2 C4.2 C5.2 C15.1 D1.2 DS1.2 L1.2 R1.2 R7.3 R8.1 U4.6 | length 8407.3
  Top Layer w20: U4.6 3751.57,1671.57 C5.2 4036.57,1670 4293.43,1670 C4.2 4295.79,1670.79 4635.2,1670.79 5181.12,2216.71 5744.9,2216.71 ; D1.2 5633.45,2475.96 5679.04,2475.96 5743.29,2411.71 5743.29,2216.71 C2.2
  Bottom Layer w20: R7.3 2882.5,4242.5 3882.5,4242.5 R8.1 3885,4455 v1(4070,4640) ; DS1.2 4070.43,4710.43 4070.43,4683.72 4070,4683.28 v1(4070,4640) ; C15.1 4285,4640 ; C2.2 5740.14,2219.86 5740.14,4214.86 5315,4640 4285,4640 ; v1(4070,4640) 4285,4640
+9V: B1.1 C1.2 C3.1 P1.1 P1.2 U2.1 | length 3307.3
  Top Layer w30: P1.1@5317.5,4897.5 P1.1 P1.2 ; C1.2 6510.79,2600 6515.79,2595 6515.79,2600 ; U2.1 6513.5,2311.7 6510.79,2314.42 6510.79,2597.52 ; B1.1 6510.79,2840.79 6510.79,2597.52 ; C3.1@6560.79,2600 6515.79,2600 ; 6510.79,2597.52 6513.27,2600 6515.79,2600
  Bottom Layer w30: P1.2 6518,3792 B1.1
ADJ+: R11.1 S4.3 S4.4 U1.4 | length 2388.9
  Top Layer w20: U1.4 4120,3085 5038.28,3085 5150.73,3197.45 5150.73,3797.1 R11.1 5150.73,3802.9 5150.73,3987.27 S4.3
  Bottom Layer w20: S4.3 S4.4
ADJ-: R13.1 S6.3 S6.4 U1.5 | length 1707
  Top Layer w20: U1.5 3920,3405 4250,3735 4597.83,3735 R13.1 4672.83,3994.37 S6.3
  Bottom Layer w20: S6.3 S6.4
ALARM: J1.3 R18.2 U1.21 U3.3 | length 2437.4
  Top Layer w20: U3.3 1786.5,2575 1912.76,2701.26 1912.76,2755.59 R18.2 ; U1.21 2420,1551.62 2856.62,1115 J1.3
  Bottom Layer w20: R18.2 2147.17,2757.83 2394.86,2510.14 2399.24,2510.14 2420,2489.38 U1.21
AM/PM: R10.1 S3.3 S3.4 U1.1 | length 995
  Bottom Layer w20: U1.1 4600,3185 4675,3260 4675,3317.17 R10.1 4675,3322.83 4675,3540 S3.3 S3.4
AMP_IN: U4.3 U5.8 | length 429.4
  Top Layer w20: U5.8 3281.34,1966.34 3299.63,1966.34 3303.29,1970 3580,1970 U4.3
AUDIO: C9.1 J1.1 J2.1 | length 1344.1
  Top Layer w20: J1.1 3063.15,1118.15 4103.15,1118.15 J2.1
D4: DS1.11 U1.11 | length 1593
  Top Layer w20: DS1.11 3180,4555 3320,4415 U1.11
D5: DS1.12 U1.12 | length 1593
  Top Layer w20: DS1.12 3080,4530 3220,4390 U1.12
D6: DS1.13 U1.14 | length 1568.1
  Top Layer w20: DS1.13 2980,4500 3034.73,4445.27 3034.73,4442.78 3040,4437.51 3040,3234.22 3025.74,3219.96 3025.74,3190.74 U1.14
D7: DS1.14 U1.15 | length 1576.4
  Top Layer w20: DS1.14 2880,4480 2944.72,4415.28 2944.72,4412.79 2950,4407.51 2950,3224.22 2920,3194.22 U1.15
EN: DS1.6 U1.10 | length 1646
  Top Layer w20: U1.10@3420,3181.67 3420,4240 3680,4500 DS1.6
GND: B1.2 B2.N C1.1 C2.1 C3.2 C4.1 C5.1 C6.1 C7.2 C10.1 C11.1 C12.2 C13.2 C14.2 C15.2 D2.2 DS1.1 DS1.5 DS1.7 DS1.8 DS1.9 DS1.10 DS1.16 J2.2 P2.1 P2.2 R2.1 R5.2 R6.3 R7.1 R8.3 R17.1 S1.1 S1.2 S2.1 S2.2 S3.1 S3.2 S4.1 S4.2 S5.1 S5.2 S6.1 S6.2 S7.1 S7.2 U1.3 U1.8 U1.13 U1.18 U1.23 U1.28 U1.33 U1.38 U2.3 U2.5 U3.5 U3.6 U3.7 U3.8 U3.9 U3.10 U3.11 U3.12 U3.13 U4.2 U4.4 U5.7 | length 2309.3
  Top Layer w20: P2.1 P2.1@1500,3590 ; v1(1950,1315) B2.N ; U1.18 v1(2620,3270) ; DS1.10 DS1.9 DS1.8 DS1.7 ; B1.2@6006.5,2849.5 B1.2 ; v1(6275,2605) 6277.5,2602.5 6323.29,2602.5 C1.1
  Bottom Layer w20: S1.1 S1.2 ; S7.1 S7.2 ; S2.1 S2.2 ; S5.1 S5.2 ; S3.1 S3.2 ; S6.1 S6.2 ; S4.1 S4.2
  other v1: 1840,2340 2225,2340 2225,2396.67 1840,2400 2225,2453.33 1840,2460 2225,2510 5950,2795 6007.5,2795 6065,2795 5950,2905 6007.5,2905 6065,2905 1585,3450 1585,3508.33 1585,3566.67 1585,3625 3280,4635 3380,4635 3480,4635 3580,4635
I2C0_SCL: R15.1 U1.17 U3.16 | length 925.5
  Top Layer w20: U3.16 2222.5,2675 2720,3172.5 U1.17 2717.5,3187.5 2717.5,3300.33 R15.1
I2C0_SDA: R16.1 U1.16 U3.15 | length 1044.7
  Top Layer w20: U3.15 2270,2625 2820,3175 U1.16 2822.5,3187.5 2822.5,3300.33 R16.1
LCD_BRT: DS1.15 R7.2 | length 280
  Top Layer w20: R7.2 DS1.15
LCD_CON: DS1.3 R8.2 | length 277.1
  Top Layer w20: DS1.3 3982.5,4717.5 3982.5,4447.5 R8.2
MODE: R9.1 S2.3 S2.4 U1.2 | length 689.1
  Bottom Layer w20: U1.2 4220,3312.83 4215.33,3317.5 4220,3322.17 4220,3526.54 S2.3 S2.4
NetC8_1: C8.1 R17.2 | length 81.6
  Top Layer w20: R17.2 C8.1
NetC8_2: C8.2 C9.2 U4.5 | length 434.6
  Top Layer w20: C8.2 3565,1495 ; U4.5 3565,1495 ; C9.2 3680,1406.19 3591.19,1495 3565,1495
NetC11_2: C11.2 U4.7 | length 233.4
  Bottom Layer w20: U4.7 3880,1470 C11.2
NetD2_1: D2.1 L1.1 U2.4 | length 433.8
  Top Layer w20: L1.1 6363.67,2020.17 6420.78,2020.17 6501.69,2101.07 U2.4 6751.13,2101.07 D2.1
NetR1_1: R1.1 R2.2 U2.2 | length 231.4
  Top Layer w20: R2.2 R1.1 R1.1 6513.46,2234.96 U2.2
RS: DS1.4 U1.9 | length 1684.1
  Top Layer w20: U1.9 3520,4250 3880,4610 DS1.4
SEL+: R12.1 S5.3 S5.4 U1.6 | length 1367.5
  Top Layer w20: U1.6 3820,3432.17 R12.1 4197.83,4027.83 4247.43,4077.43 4280.9,4077.43 S5.3
  Bottom Layer w20: S5.3 S5.4
SEL-: R14.1 S7.3 S7.4 U1.7 | length 1208
  Top Layer w20: U1.7 3720,3814.33 R14.1 3720,3815.67 3720,3996.54 3815,4091.54 S7.3
  Bottom Layer w20: S7.3 S7.4
SPI0_CLK: U1.24 U5.2 | length 737.9
  Bottom Layer w20: U1.24 2720,2464.38 2713.76,2458.14 2713.76,2096.24 2936.25,1873.75 2939.78,1873.75 2953.53,1860 U5.2
SPI0_CSN: U1.22 U5.1 | length 781.5
  Top Layer w20: U1.22 2520,2464.38 2532.64,2451.74 2532.64,2447.36 2685,2295 2810,2295 2958.75,2146.25 2958.75,1963.75 U5.1
SPI0_TX: U1.25 U5.3 | length 784
  Top Layer w20: v1(2820,2180) 2820,1902.5 U5.3
  Bottom Layer w20: v1(2820,2180) U1.25
SPK_VOL: R6.2 U1.31 | length 280.2
  Top Layer w20: U1.31 3420,2472.5 3607.5,2285 R6.2
SYNC_RTC: R3.1 S1.3 S1.4 U1.27 | length 461.8
  Top Layer w20: R3.1 R3.1@3018.46,2374.37 ; S1.3@3018.46,2280.63 S1.3
  Bottom Layer w20: U1.27@3019.09,2484.09 3019.09,2375 S1.3 S1.4
USB_CHECK: R4.2 R5.1 U1.34 | length 594
  Top Layer w20: U1.34 3720,2295.64 3920.64,2095 R4.2 R5.1
V_BUS: R4.1 U1.40 | length 426.2
  Top Layer w20: R4.1 4290.83,2085 4320,2114.17 U1.40
V_SYS: C10.2 C13.1 D1.1 U1.39 | length 774.4
  Top Layer w20: C13.1@4480,2546.57 4482.5,2544.07 4482.5,2407.5 C10.2 ; C13.1@4490,2546.57 C13.1 4728.43,2556.57 D1.1
  Bottom Layer w20: U1.39 4220,2497.5 4277.5,2555 4450.66,2555
pads on no net: B1.3 B1.4 B1.5 J1.2 J1.4 U1.19 U1.20 U1.26 U1.29 U1.30 U1.32 U1.37 U3.1 U3.4 U4.1 U4.8 U5.5

## Polygon pours and split planes (outlines as drawn)
+3V3 on Top Layer "+3V3_L01_P004" (solid, pour order 4): 1545,2815 1545,2520 1695,2520 1695,2815
+5V on Top Layer "+5V_L01_P002" (solid, pour order 2): 6150,2290 5780,2290 5780,2005 5855,1930 6150,1930
GND on Top Layer "GND_L01_P008" (solid, pour order 8): 5910,2945 6110,2945 6110,2755 5910,2755
GND on Top Layer "GND_L01_P009" (solid, pour order 9): 3230,4775 3230,4575 3630,4575 3630,4775
GND on Top Layer "GND_L01_P007" (solid, pour order 7): 1430,3665 1630,3665 1630,3410 1430,3410
GND on Top Layer "GND_L01_P006" (solid, pour order 6): 2090,2540 2265,2540 2265,2310 2090,2310
GND on Top Layer "GND_L01_P005" (solid, pour order 5): 1720,2490 1885,2490 1885,2310 1720,2310
+3V3 on Bottom Layer "+3V3_L04_P010" (solid, pour order 10): 3770,2625 3770,2425 3975,2425 3975,2625
+3V3 on +3V3 (split plane): 6811.77,5054.61 6823.49,5053.46 6835.11,5051.54 6846.59,5048.86 6857.86,5045.44 6868.88,5041.3 6879.61,5036.43 6890,5030.88 6900,5024.66 6909.57,5017.8 6918.68,5010.33 6927.28,5002.28 6935.33,4993.68 6942.8,4984.58 6949.66,4975 6955.88,4965 6961.43,4954.61 6966.29,4943.88 6970.44,4932.86 6973.86,4921.59 6976.54,4910.12 6978.46,4898.5 6979.61,4886.77 6979.97,4875.71 6979.9,4875 6979.9,1105 6979.97,1104.29 6979.61,1093.23 6978.46,1081.51 6976.54,1069.88 6973.86,1058.41 6970.44,1047.14 6966.3,1036.12 6961.43,1025.39 6955.88,1015 6949.66,1005 6942.8,995.43 6935.33,986.32 6927.28,977.72 6918.68,969.67 6909.58,962.2 6900,955.34 6890,949.12 6879.61,943.57 6868.88,938.71 6857.86,934.56 6846.59,931.14 6835.12,928.46 6823.49,926.54 6811.77,925.39 6800.71,925.03 6800,925.1 6600,925.1 1480,925.1 1479.29,925.03 1468.23,925.39 1456.51,926.54 1444.88,928.46 1433.41,931.14 1422.14,934.56 1411.12,938.7 1400.39,943.57 1390,949.12 1380,955.34 1370.43,962.2 1361.32,969.67 1352.72,977.72 1344.67,986.32 1337.2,995.42 1330.34,1005 1324.12,1015 1318.57,1025.39 1313.7,1036.12 1309.56,1047.14 1306.14,1058.41 1303.46,1069.88 1301.54,1081.51 1300.39,1093.23 1300.03,1104.29 1300.1,1105 1300.1,4875 1300.03,4875.71 1300.39,4886.77 1301.54,4898.49 1303.46,4910.11 1306.14,4921.59 1309.56,4932.86 1313.7,4943.88 1318.57,4954.61 1324.12,4965 1330.34,4975 1337.2,4984.57 1344.67,4993.68 1352.72,5002.28 1361.32,5010.33 1370.42,5017.8 1380,5024.66 1390,5030.88 1400.39,5036.43 1411.12,5041.29 1422.14,5045.44 1433.41,5048.86 1444.88,5051.54 1456.5,5053.46 1468.23,5054.61 1479.29,5054.97 1480,5054.9 6800,5054.9 6800.71,5054.97
GND on GND (split plane): 6811.77,5054.61 6823.49,5053.46 6835.11,5051.54 6846.59,5048.86 6857.86,5045.44 6868.88,5041.3 6879.61,5036.43 6890,5030.88 6900,5024.66 6909.57,5017.8 6918.68,5010.33 6927.28,5002.28 6935.33,4993.68 6942.8,4984.58 6949.66,4975 6955.88,4965 6961.43,4954.61 6966.29,4943.88 6970.44,4932.86 6973.86,4921.59 6976.54,4910.12 6978.46,4898.5 6979.61,4886.77 6979.97,4875.71 6979.9,4875 6979.9,1105 6979.97,1104.29 6979.61,1093.23 6978.46,1081.51 6976.54,1069.88 6973.86,1058.41 6970.44,1047.14 6966.3,1036.12 6961.43,1025.39 6955.88,1015 6949.66,1005 6942.8,995.43 6935.33,986.32 6927.28,977.72 6918.68,969.67 6909.58,962.2 6900,955.34 6890,949.12 6879.61,943.57 6868.88,938.71 6857.86,934.56 6846.59,931.14 6835.12,928.46 6823.49,926.54 6811.77,925.39 6800.71,925.03 6800,925.1 6600,925.1 1480,925.1 1479.29,925.03 1468.23,925.39 1456.51,926.54 1444.88,928.46 1433.41,931.14 1422.14,934.56 1411.12,938.7 1400.39,943.57 1390,949.12 1380,955.34 1370.43,962.2 1361.32,969.67 1352.72,977.72 1344.67,986.32 1337.2,995.42 1330.34,1005 1324.12,1015 1318.57,1025.39 1313.7,1036.12 1309.56,1047.14 1306.14,1058.41 1303.46,1069.88 1301.54,1081.51 1300.39,1093.23 1300.03,1104.29 1300.1,1105 1300.1,4875 1300.03,4875.71 1300.39,4886.77 1301.54,4898.49 1303.46,4910.11 1306.14,4921.59 1309.56,4932.86 1313.7,4943.88 1318.57,4954.61 1324.12,4965 1330.34,4975 1337.2,4984.57 1344.67,4993.68 1352.72,5002.28 1361.32,5010.33 1370.42,5017.8 1380,5024.66 1390,5030.88 1400.39,5036.43 1411.12,5041.29 1422.14,5045.44 1433.41,5048.86 1444.88,5051.54 1456.5,5053.46 1468.23,5054.61 1479.29,5054.97 1480,5054.9 6800,5054.9 6800.71,5054.97

## Silkscreen, mask and mechanical layers (free items; w line width, h text height)
Mechanical 1:
  the board outline again, w10

## Text inside footprints (layer, text, board x,y; h text height)
U3: Mechanical 13 "*" at 1799.5,2653.5 h50; Mechanical 13 "DS3231" at 1859,2475 h50; Top Overlay "*" at 1737.5,2691 h50